# Altium PCB PMP41115.PcbDoc (part 4 of 6)
Units mm, origin at the board's own origin, x right, y up, seen from the top; angles counter-clockwise.
Board outline 102.92 x 46.74 mm, 4 copper layers (Top Layer, Signal Layer 1, Signal Layer 2, Bottom Layer), stack 1.016 mm thick; 174 components, 114 nets, 547 pads, 2622 vias.
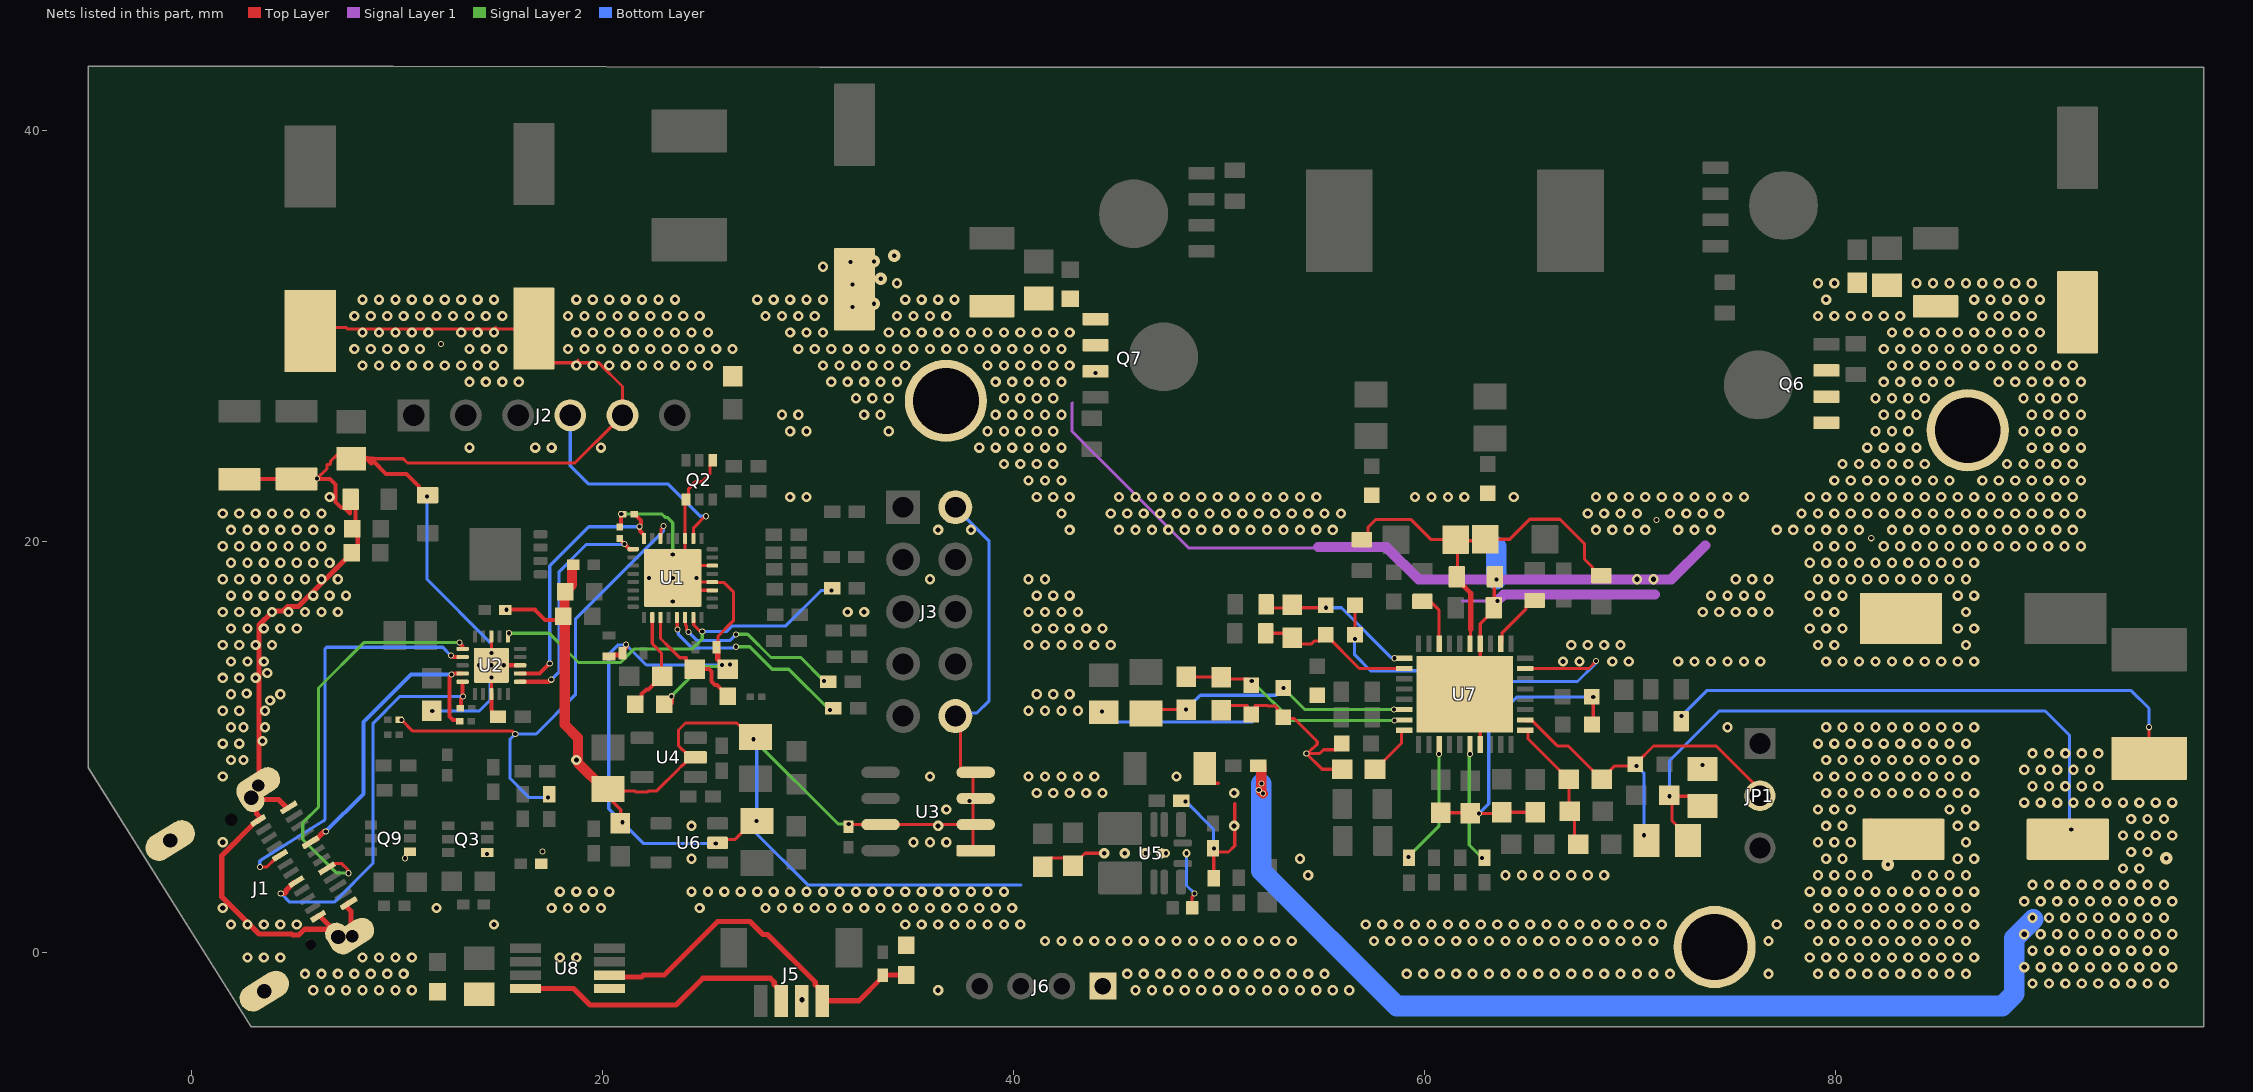
[diagram p4: the nets of this part, all layers, seen from the top]

## Via types
v1: diameter 0.5, hole 0.25, Top Layer to Bottom Layer, 2320 vias
v2: diameter 0.3, hole 0.2, Top Layer to Bottom Layer, tented both sides, 198 vias
v3: diameter 0.5, hole 0.25, Top Layer to Bottom Layer, tented both sides, 61 vias
v4: diameter 0.5, hole 0.2, Top Layer to Bottom Layer, tented both sides, 19 vias
v5: diameter 0.61, hole 0.203, Top Layer to Bottom Layer, tented both sides, 13 vias
v6: diameter 0.5, hole 0.2, Top Layer to Bottom Layer, 6 vias
v7: diameter 0.4, hole 0.2, Top Layer to Bottom Layer, tented both sides, 3 vias
v8: diameter 0.35, hole 0.2, Top Layer to Bottom Layer, tented both sides, 2 vias

## Nets (pads, with @x,y where several pads share a name; then routed paths per layer and width w, separated by ;. In a path a pad name is that pad's centre, name@x,y a point inside that pad or via, vN(x,y) a via of type N, cw(c..) or ccw(c..) an arc to the next point about the centre after c; other vN are vias at no path point) (continued)
GND: (continued)
  Signal Layer 2 w0.152: v2(20.931,21.339) 22.914,21.339 23.072,21.181 23.165,21.181 23.435,20.911 23.435,19.491 v4@23.495,19.431 ; v2(23.369,12.475) 24.817,13.923 v2@25.832,13.923 ; v2@25.832,13.927 25.832,13.94 25.9,14.008 26.2,14.008 v2(26.213,14.021) ; v2(27.356,10.389) 31.479,6.266 v2(31.994,6.266) 32.038,6.266 v2@32.055,6.248
  Bottom Layer w0.152: v2(11.481,22.2) 11.481,18.161 14.61,15.032 14.61,14.661 v4@14.605,14.656 ; v2(11.735,11.76) 14.021,11.76 14.554,12.294 14.554,13.223 14.641,13.31 v4@14.681,13.31 ; v2@20.93,6.325 21.006,6.325 22.022,5.309 v2(25.527,5.309) ; v2(20.98,6.35) 20.32,7.01 20.32,14.518 20.78,14.978 21.15,14.978 v2(21.158,14.986) 22.149,13.995 v2(25.832,13.995) ; v2(27.356,10.389) 27.523,10.222 v2@27.523,6.426 ; v2(27.508,6.401) 27.508,5.791 29.997,3.302 40.361,3.302 ; J3.2@37.182,21.674 38.811,20.044 38.811,12.243 38.235,11.667 J3.10@37.651,11.667 ; 44.152,11.514 44.287,11.649 44.287,11.717 v2(44.315,11.745) 44.827,11.233 51.623,11.233 ; v2(48.387,7.366) 49.733,6.02 v2@49.733,5.012 ; v7(48.425,4.839) 48.425,3.274 v2(48.813,2.886) ; v2(56.617,15.265) 56.606,15.255 56.606,14.488 57.379,13.716 60.396,13.716 60.808,14.128 ; v2(62.662,6.782) 63.128,7.248 63.128,11.028 ; 63.957,11.989 64.018,11.928 ; 63.983,11.989 64.044,11.989 64.493,12.438 v2(68.214,12.438) ; 64.018,13.193 67.447,13.193 68.313,14.058 68.313,14.122 68.317,14.126 v2@68.373,14.126
  Bottom Layer w1: v2(63.5,18.161) 63.5,19.761
  other v1: 5.944,-1.828 6.744,-1.828 7.544,-1.828 8.344,-1.828 9.144,-1.828 9.944,-1.828 10.744,-1.828 36.344,-1.828 45.944,-1.828 46.744,-1.828 47.544,-1.828 48.344,-1.828 49.144,-1.828 49.944,-1.828 50.744,-1.828 51.544,-1.828 52.344,-1.828 53.144,-1.828 53.944,-1.828 54.744,-1.828 55.544,-1.828 56.344,-1.828 5.544,-1.028 6.344,-1.028 7.144,-1.028 7.944,-1.028 8.744,-1.028 9.544,-1.028 10.344,-1.028 45.544,-1.028 46.344,-1.028 47.144,-1.028 47.944,-1.028 48.744,-1.028 49.544,-1.028 50.344,-1.028 51.144,-1.028 51.944,-1.028 52.744,-1.028 53.544,-1.028 54.344,-1.028 55.144,-1.028 59.144,-1.028 59.944,-1.028 60.744,-1.028 61.544,-1.028 62.344,-1.028 63.144,-1.028 63.944,-1.028 64.744,-1.028 65.544,-1.028 66.344,-1.028 67.144,-1.028 67.944,-1.028 68.744,-1.028 69.544,-1.028 70.344,-1.028 71.144,-1.028 71.944,-1.028 76.744,-1.028 79.144,-1.028 79.944,-1.028 80.744,-1.028 81.544,-1.028 82.344,-1.028 83.144,-1.028 83.944,-1.028 84.744,-1.028 85.544,-1.028 86.344,-1.028 2.744,-0.228 3.544,-0.228 4.344,-0.228 8.344,-0.228 9.144,-0.228 9.944,-0.228 10.744,-0.228 17.944,-0.228 18.744,-0.228 78.744,-0.228 79.544,-0.228 80.344,-0.228 81.144,-0.228 81.944,-0.228 82.744,-0.228 83.544,-0.228 84.344,-0.228 85.144,-0.228 85.944,-0.228 86.744,-0.228 41.544,0.572 42.344,0.572 43.144,0.572 43.944,0.572 44.744,0.572 45.544,0.572 46.344,0.572 47.144,0.572 47.944,0.572 48.744,0.572 49.544,0.572 50.344,0.572 51.144,0.572 51.944,0.572 52.744,0.572 53.544,0.572 57.544,0.572 58.344,0.572 59.144,0.572 59.944,0.572 60.744,0.572 61.544,0.572 62.344,0.572 63.144,0.572 63.944,0.572 64.744,0.572 65.544,0.572 66.344,0.572 67.144,0.572 67.944,0.572 68.744,0.572 69.544,0.572 70.344,0.572 71.144,0.572 76.744,0.572 79.144,0.572 79.944,0.572 80.744,0.572 81.544,0.572 82.344,0.572 83.144,0.572 83.944,0.572 84.744,0.572 85.544,0.572 86.344,0.572 1.944,1.372 2.744,1.372 3.544,1.372 4.344,1.372 5.144,1.372 14.744,1.372 34.744,1.372 35.544,1.372 36.344,1.372 37.144,1.372 37.944,1.372 38.744,1.372 39.544,1.372 40.344,1.372 57.144,1.372 57.944,1.372 58.744,1.372 59.544,1.372 60.344,1.372 61.144,1.372 61.944,1.372 62.744,1.372 63.544,1.372 64.344,1.372 65.144,1.372 65.944,1.372 66.744,1.372 67.544,1.372 68.344,1.372 69.144,1.372 69.944,1.372 70.744,1.372 71.544,1.372 77.144,1.372 78.744,1.372 79.544,1.372 80.344,1.372 81.144,1.372 81.944,1.372 82.744,1.372 83.544,1.372 84.344,1.372 85.144,1.372 85.944,1.372 86.744,1.372 1.544,2.172 11.944,2.172 17.544,2.172 18.344,2.172 19.144,2.172 19.944,2.172 24.744,2.172 27.944,2.172 28.744,2.172 29.544,2.172 30.344,2.172 31.144,2.172 31.944,2.172 32.744,2.172 33.544,2.172 34.344,2.172 35.144,2.172 35.944,2.172 36.744,2.172 37.544,2.172 38.344,2.172 39.144,2.172 39.944,2.172 79.144,2.172 79.944,2.172 80.744,2.172 81.544,2.172 82.344,2.172 83.144,2.172 83.944,2.172 84.744,2.172 85.544,2.172 86.344,2.172 17.944,2.972 18.744,2.972 19.544,2.972 20.344,2.972 24.344,2.972 25.144,2.972 25.944,2.972 26.744,2.972 27.544,2.972 28.344,2.972 29.144,2.972 29.944,2.972 30.744,2.972 31.544,2.972 32.344,2.972 33.144,2.972 33.944,2.972 34.744,2.972 35.544,2.972 36.344,2.972 37.144,2.972 37.944,2.972 38.744,2.972 39.544,2.972 78.744,2.972 79.544,2.972 80.344,2.972 81.144,2.972 81.944,2.972 82.744,2.972 83.544,2.972 84.344,2.972 85.144,2.972 85.944,2.972 86.744,2.972 54.344,3.772 63.944,3.772 64.744,3.772 65.544,3.772 66.344,3.772 67.144,3.772 67.944,3.772 68.744,3.772 79.144,3.772 79.944,3.772 80.744,3.772 81.544,3.772 83.944,3.772 84.744,3.772 85.544,3.772 86.344,3.772 24.344,4.572 53.944,4.572 79.544,4.572 80.344,4.572 85.944,4.572 86.744,4.572 1.544,5.372 35.144,5.372 35.944,5.372 36.744,5.372 79.144,5.372 79.944,5.372 80.744,5.372 86.344,5.372 24.344,6.172 36.344,6.172 50.744,6.172 79.544,6.172 80.344,6.172 85.944,6.172 86.744,6.172 36.744,6.972 79.144,6.972 79.944,6.972 80.744,6.972 85.544,6.972 86.344,6.972 41.144,7.772 41.944,7.772 42.744,7.772 43.544,7.772 44.344,7.772 50.744,7.772 79.544,7.772 80.344,7.772 81.144,7.772 81.944,7.772 82.744,7.772 83.544,7.772 84.344,7.772 85.144,7.772 85.944,7.772 86.744,7.772 1.544,8.572 35.944,8.572 40.744,8.572 41.544,8.572 42.344,8.572 43.144,8.572 43.944,8.572 47.944,8.572 79.144,8.572 79.944,8.572 80.744,8.572 81.544,8.572 82.344,8.572 83.144,8.572 83.944,8.572 84.744,8.572 85.544,8.572 86.344,8.572 1.944,9.372 2.547,9.372 18.744,9.372 79.544,9.372 80.344,9.372 81.144,9.372 81.944,9.372 82.744,9.372 83.544,9.372 84.344,9.372 85.144,9.372 85.944,9.372 86.744,9.372 1.544,10.172 2.344,10.172 79.144,10.172 79.944,10.172 80.744,10.172 81.544,10.172 82.344,10.172 83.144,10.172 83.944,10.172 84.744,10.172 85.544,10.172 86.344,10.172 1.944,10.972 2.547,10.972 3.6,10.972 74.744,10.972 79.544,10.972 80.344,10.972 81.144,10.972 81.944,10.972 82.744,10.972 83.544,10.972 84.344,10.972 85.144,10.972 85.944,10.972 86.744,10.972 1.544,11.772 2.344,11.772 40.744,11.772 41.544,11.772 42.344,11.772 43.144,11.772 3.849,12.267 1.944,12.572 4.344,12.572 41.144,12.572 41.944,12.572 42.744,12.572 2.705,12.611 1.544,13.372 2.344,13.372 3.144,13.372 3.705,13.611 1.944,14.172 2.744,14.172 3.544,14.172 66.744,14.172 67.544,14.172 69.144,14.172 69.944,14.172 72.344,14.172 73.144,14.172 73.944,14.172 74.744,14.172 75.544,14.172 76.344,14.172 79.544,14.172 80.344,14.172 81.144,14.172 81.944,14.172 82.744,14.172 83.544,14.172 84.344,14.172 85.144,14.172 85.944,14.172 86.744,14.172 1.544,14.972 2.344,14.972 3.144,14.972 3.944,14.972 40.744,14.972 41.544,14.972 42.344,14.972 43.144,14.972 43.944,14.972 44.744,14.972 67.144,14.972 67.944,14.972 68.744,14.972 69.544,14.972 79.144,14.972 79.944,14.972 86.344,14.972 1.944,15.772 2.744,15.772 3.544,15.772 4.344,15.772 5.144,15.772 41.144,15.772 41.944,15.772 42.744,15.772 43.544,15.772 44.344,15.772 78.744,15.772 79.544,15.772 80.344,15.772 85.944,15.772 86.744,15.772 1.544,16.572 2.344,16.572 3.144,16.572 3.944,16.572 4.744,16.572 5.544,16.572 6.344,16.572 7.144,16.572 31.944,16.572 32.744,16.572 40.744,16.572 41.544,16.572 42.344,16.572 43.144,16.572 73.544,16.572 74.344,16.572 75.144,16.572 75.944,16.572 76.744,16.572 79.144,16.572 79.944,16.572 86.344,16.572 1.944,17.372 2.744,17.372 3.544,17.372 4.344,17.372 5.144,17.372 5.944,17.372 6.744,17.372 7.544,17.372 41.144,17.372 41.944,17.372 42.744,17.372 73.944,17.372 74.744,17.372 75.544,17.372 76.344,17.372 78.744,17.372 79.544,17.372 80.344,17.372 85.944,17.372 86.744,17.372 1.544,18.172 2.344,18.172 3.144,18.172 3.944,18.172 4.744,18.172 5.544,18.172 6.344,18.172 7.144,18.172 35.944,18.172 40.744,18.172 41.544,18.172 70.344,18.172 71.144,18.172 75.144,18.172 75.944,18.172 76.744,18.172 79.144,18.172 79.944,18.172 80.744,18.172 81.544,18.172 82.344,18.172 83.144,18.172 83.944,18.172 84.744,18.172 85.544,18.172 86.344,18.172 1.944,18.972 2.744,18.972 3.544,18.972 4.344,18.972 5.144,18.972 5.944,18.972 6.744,18.972 78.744,18.972 79.544,18.972 80.344,18.972 81.144,18.972 81.944,18.972 82.744,18.972 83.544,18.972 84.344,18.972 85.144,18.972 85.944,18.972 86.744,18.972 1.544,19.772 2.344,19.772 3.144,19.772 3.944,19.772 4.744,19.772 5.544,19.772 6.344,19.772 79.144,19.772 79.944,19.772 80.744,19.772 82.344,19.772 83.144,19.772 83.944,19.772 84.744,19.772 85.544,19.772 86.344,19.772 87.144,19.772 87.944,19.772 88.744,19.772 89.544,19.772 90.344,19.772 91.144,19.772 91.944,19.772 1.944,20.572 2.744,20.572 3.544,20.572 4.344,20.572 5.144,20.572 5.944,20.572 6.744,20.572 36.344,20.572 37.944,20.572 42.744,20.572 45.144,20.572 45.944,20.572 46.744,20.572 47.544,20.572 48.344,20.572 49.144,20.572 49.944,20.572 50.744,20.572 51.544,20.572 52.344,20.572 53.144,20.572 53.944,20.572 54.744,20.572 55.544,20.572 68.344,20.572 69.144,20.572 69.944,20.572 70.744,20.572 72.344,20.572 73.144,20.572 73.944,20.572 77.144,20.572 77.944,20.572 78.744,20.572 79.544,20.572 80.344,20.572 81.144,20.572 82.744,20.572 83.544,20.572 84.344,20.572 85.144,20.572 85.944,20.572 86.744,20.572 87.544,20.572 88.344,20.572 89.144,20.572 89.944,20.572 90.744,20.572 91.544,20.572 1.544,21.372 2.344,21.372 3.144,21.372 3.944,21.372 4.744,21.372 5.544,21.372 6.344,21.372 42.344,21.372 44.744,21.372 45.544,21.372 46.344,21.372 47.144,21.372 47.944,21.372 48.744,21.372 49.544,21.372 50.344,21.372 51.144,21.372 51.944,21.372 52.744,21.372 53.544,21.372 54.344,21.372 55.144,21.372 55.944,21.372 67.944,21.372 68.744,21.372 69.544,21.372 70.344,21.372 71.944,21.372 72.744,21.372 73.544,21.372 74.344,21.372 78.344,21.372 79.144,21.372 79.944,21.372 80.744,21.372 81.544,21.372 82.344,21.372 83.144,21.372 83.944,21.372 84.744,21.372 85.544,21.372 86.344,21.372 87.144,21.372 87.944,21.372 88.744,21.372 89.544,21.372 90.344,21.372 91.144,21.372 91.944,21.372 6.744,22.172 29.144,22.172 29.944,22.172 41.144,22.172 41.944,22.172 42.744,22.172 45.144,22.172 45.944,22.172 46.744,22.172 47.544,22.172 48.344,22.172 49.144,22.172 49.944,22.172 50.744,22.172 51.544,22.172 52.344,22.172 53.144,22.172 53.944,22.172 54.744,22.172 59.544,22.172 60.344,22.172 61.144,22.172 61.944,22.172 64.344,22.172 68.344,22.172 69.144,22.172 69.944,22.172 70.744,22.172 71.544,22.172 72.344,22.172 73.144,22.172 73.944,22.172 74.744,22.172 75.544,22.172 78.744,22.172 79.544,22.172 80.344,22.172 81.144,22.172 81.944,22.172 82.744,22.172 83.544,22.172 84.344,22.172 85.144,22.172 85.944,22.172 86.744,22.172 87.544,22.172 88.344,22.172 89.144,22.172 89.944,22.172 90.744,22.172 91.544,22.172 40.744,22.972 41.544,22.972 42.344,22.972 79.944,22.972 80.744,22.972 81.544,22.972 82.344,22.972 83.144,22.972 83.944,22.972 84.744,22.972 85.544,22.972 87.144,22.972 87.944,22.972 88.744,22.972 89.544,22.972 90.344,22.972 91.144,22.972 91.944,22.972 39.544,23.772 40.344,23.772 41.144,23.772 41.944,23.772 80.344,23.772 81.144,23.772 81.944,23.772 82.744,23.772 83.544,23.772 84.344,23.772 88.344,23.772 89.144,23.772 89.944,23.772 90.744,23.772 91.544,23.772 13.544,24.572 16.744,24.572 17.544,24.572 19.944,24.572 38.344,24.572 39.144,24.572 39.944,24.572 40.744,24.572 41.544,24.572 42.344,24.572 81.544,24.572 82.344,24.572 83.144,24.572 83.944,24.572 89.544,24.572 90.344,24.572 91.144,24.572 91.944,24.572 29.144,25.372 29.944,25.372 33.944,25.372 38.744,25.372 39.544,25.372 40.344,25.372 41.144,25.372 41.944,25.372 81.944,25.372 82.744,25.372 83.544,25.372 89.144,25.372 89.944,25.372 90.744,25.372 91.544,25.372 28.744,26.172 29.544,26.172 32.744,26.172 33.544,26.172 39.144,26.172 39.944,26.172 40.744,26.172 41.544,26.172 42.344,26.172 82.344,26.172 83.144,26.172 83.944,26.172 89.544,26.172 90.344,26.172 91.144,26.172 91.944,26.172 32.344,26.972 33.144,26.972 33.944,26.972 39.544,26.972 40.344,26.972 41.144,26.972 41.944,26.972 81.944,26.972 82.744,26.972 83.544,26.972 84.344,26.972 89.144,26.972 89.944,26.972 90.744,26.972 91.544,26.972 13.544,27.772 14.344,27.772 15.144,27.772 15.944,27.772 31.144,27.772 31.944,27.772 32.744,27.772 33.544,27.772 34.344,27.772 39.144,27.772 39.944,27.772 40.744,27.772 41.544,27.772 42.344,27.772 82.344,27.772 83.144,27.772 83.944,27.772 84.744,27.772 85.544,27.772 87.944,27.772 88.744,27.772 89.544,27.772 90.344,27.772 91.144,27.772 91.944,27.772 8.344,28.572 9.144,28.572 9.944,28.572 10.744,28.572 11.544,28.572 12.344,28.572 13.144,28.572 13.944,28.572 14.744,28.572 18.744,28.572 19.544,28.572 20.344,28.572 21.144,28.572 21.944,28.572 22.744,28.572 23.544,28.572 24.344,28.572 25.144,28.572 30.744,28.572 31.544,28.572 32.344,28.572 33.144,28.572 33.944,28.572 34.744,28.572 38.744,28.572 39.544,28.572 40.344,28.572 41.144,28.572 41.944,28.572 42.744,28.572 82.744,28.572 83.544,28.572 84.344,28.572 85.144,28.572 85.944,28.572 86.744,28.572 87.544,28.572 88.344,28.572 89.144,28.572 89.944,28.572 90.744,28.572 91.544,28.572 7.944,29.372 8.744,29.372 9.544,29.372 10.344,29.372 11.144,29.372 13.544,29.372 14.344,29.372 15.144,29.372 18.344,29.372 19.144,29.372 19.944,29.372 20.744,29.372 21.544,29.372 22.344,29.372 23.144,29.372 23.944,29.372 24.744,29.372 25.544,29.372 26.344,29.372 29.544,29.372 30.344,29.372 31.144,29.372 31.944,29.372 32.744,29.372 33.544,29.372 34.344,29.372 35.144,29.372 35.944,29.372 36.744,29.372 37.544,29.372 38.344,29.372 39.144,29.372 39.944,29.372 40.744,29.372 41.544,29.372 42.344,29.372 82.344,29.372 83.144,29.372 83.944,29.372 84.744,29.372 85.544,29.372 86.344,29.372 87.144,29.372 87.944,29.372 88.744,29.372 89.544,29.372 8.344,30.172 9.144,30.172 9.944,30.172 10.744,30.172 11.544,30.172 13.144,30.172 13.944,30.172 14.744,30.172 18.744,30.172 19.544,30.172 20.344,30.172 21.144,30.172 21.944,30.172 22.744,30.172 23.544,30.172 24.344,30.172 25.144,30.172 29.144,30.172 29.944,30.172 30.744,30.172 33.944,30.172 34.744,30.172 35.544,30.172 36.344,30.172 37.144,30.172 37.944,30.172 38.744,30.172 39.544,30.172 40.344,30.172 41.144,30.172 41.944,30.172 42.744,30.172 82.744,30.172 83.544,30.172 84.344,30.172 85.144,30.172 85.944,30.172 86.744,30.172 87.544,30.172 88.344,30.172 89.144,30.172 89.944,30.172 7.944,30.972 8.744,30.972 9.544,30.972 10.344,30.972 11.144,30.972 11.944,30.972 12.744,30.972 13.544,30.972 14.344,30.972 15.144,30.972 18.344,30.972 19.144,30.972 19.944,30.972 20.744,30.972 21.544,30.972 22.344,30.972 23.144,30.972 23.944,30.972 24.744,30.972 27.944,30.972 28.744,30.972 29.544,30.972 30.344,30.972 34.344,30.972 35.144,30.972 35.944,30.972 36.744,30.972 79.144,30.972 79.944,30.972 80.744,30.972 81.544,30.972 82.344,30.972 83.144,30.972 87.144,30.972 87.944,30.972 88.744,30.972 89.544,30.972 8.344,31.772 9.144,31.772 9.944,31.772 10.744,31.772 11.544,31.772 12.344,31.772 13.144,31.772 13.944,31.772 14.744,31.772 18.744,31.772 19.544,31.772 20.344,31.772 21.144,31.772 21.944,31.772 22.744,31.772 23.544,31.772 27.544,31.772 28.344,31.772 29.144,31.772 29.944,31.772 30.744,31.772 34.744,31.772 35.544,31.772 36.344,31.772 37.144,31.772 79.544,31.772 86.744,31.772 87.544,31.772 88.344,31.772 89.144,31.772 89.944,31.772 34.344,32.572 79.144,32.572 79.944,32.572 83.944,32.572 84.744,32.572 85.544,32.572 86.344,32.572 87.144,32.572 87.944,32.572 88.744,32.572 89.544,32.572 30.744,33.372
  other v2: 10.414,4.597 14.402,4.801 17.094,4.928 49.759,5.08 37.861,7.383 73.523,9.136 68.341,14.19 15.342,16.688 81.737,20.168 71.298,21.057 44.008,28.211 12.156,29.608
  other v4: 45.425,4.839 46.425,4.839 14.61,13.384 14.01,13.984 14.61,13.984 15.21,13.984 14.61,14.584 23.435,17.082 22.285,18.232 23.435,18.232 24.585,18.232 23.435,19.382
  other v5: 82.55,4.293 32.182,31.42 33.223,31.572 32.182,32.512 32.08,33.604 33.223,33.63 34.214,33.909
  other v7: 47.425,4.839
GPIO0: R110.1 U1.5 | length 9.8
  Top Layer w0.152: U1.5@23.635,16.307 23.654,16.288 23.654,15.741 v2(23.673,15.723)
  Signal Layer 2 w0.152: v2(26.518,14.884) 27.178,14.884 28.272,13.791 29.084,13.791 v2@31.064,11.811
  Bottom Layer w0.152: v2(23.673,15.723) 23.701,15.694 23.701,15.499 24.366,14.834 26.362,14.834 26.385,14.856 26.489,14.856 v2(26.518,14.884)
  other v2: 31.079,11.803
GPIO1: R66.1 U1.6 | length 8.6
  Top Layer w0.152: U1.6@24.035,16.307 24.059,16.283 24.059,15.939 24.099,15.899 24.099,15.744 24.204,15.639 v2(24.204,15.599)
  Signal Layer 2 w0.152: v2(26.518,15.474) 26.537,15.494 27.076,15.494 28.211,14.36 29.665,14.36 v2@30.785,13.24
  Bottom Layer w0.152: v2(24.204,15.599) 24.608,15.195 26.225,15.195 26.505,15.474 v2(26.518,15.474)
  other v2: 30.8,13.225
GPIO4: R17.1 R99.1 U1.22 | length 24.9
  Top Layer w0.152: v2(10.236,11.328) 10.77,10.795 15.61,10.795 15.763,10.643 v2(15.773,10.643) ; v2(17.374,7.544) 17.45,7.62 R99.1@17.602,7.62 ; U1.22@22.835,20.157 22.859,20.18 22.859,20.586 22.988,20.715 v2(22.988,20.755)
  Bottom Layer w0.152: v2(17.374,7.544) 16.459,7.544 15.519,8.484 15.519,10.389 v2(15.773,10.643) 16.789,10.643 18.694,12.548 18.694,16.231 22.976,20.512 22.976,20.743 v2(22.988,20.755)